# Altium PCB Control_Board.PcbDoc
Units mm, origin at the board's own origin, x right, y up, seen from the top; angles counter-clockwise.
Board outline 74 x 60 mm, 4 copper layers (Top Layer, Int1 (GND), Int2 (GND), Bottom Layer), stack 1.591 mm thick; 66 components, 56 nets, 227 pads, 83 vias.
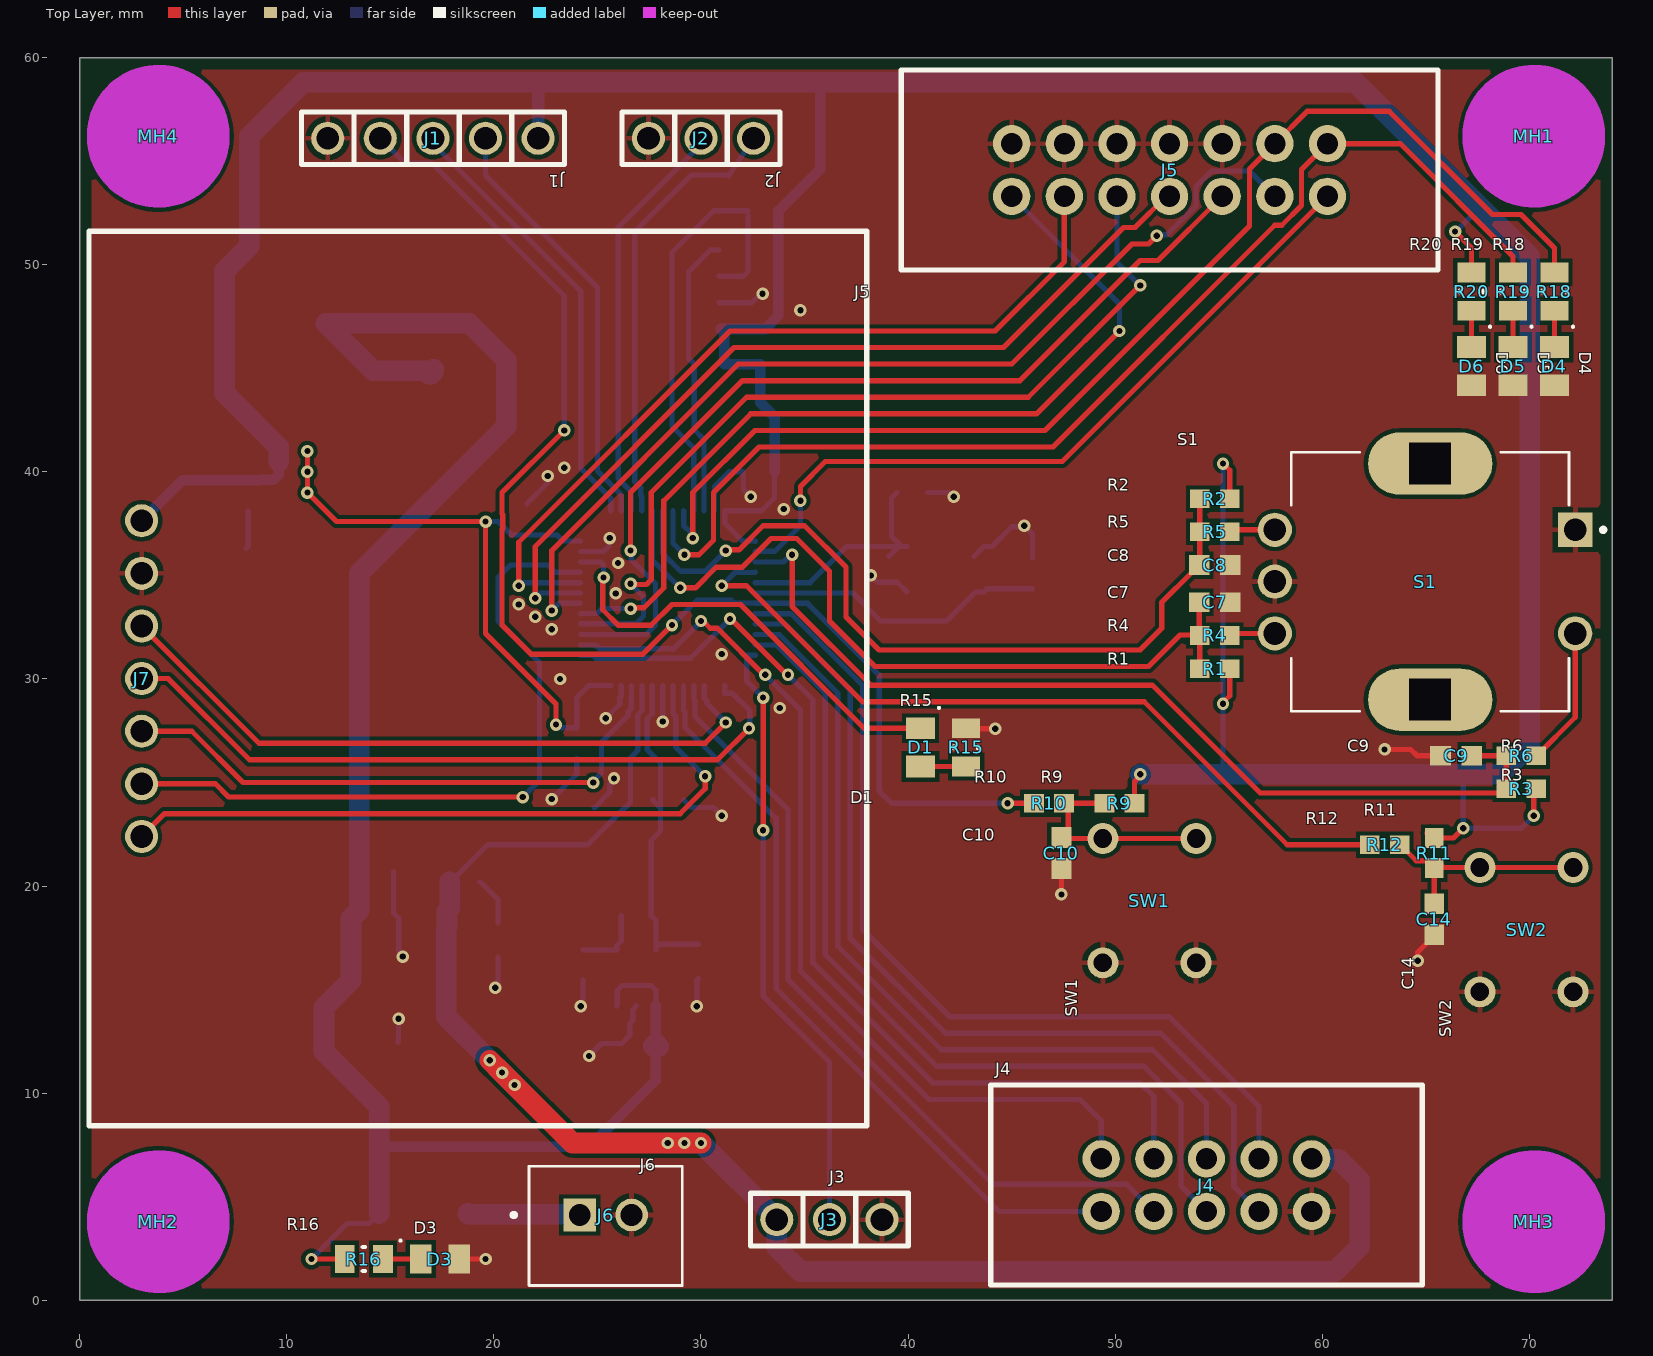
[diagram p0: Top Layer view]
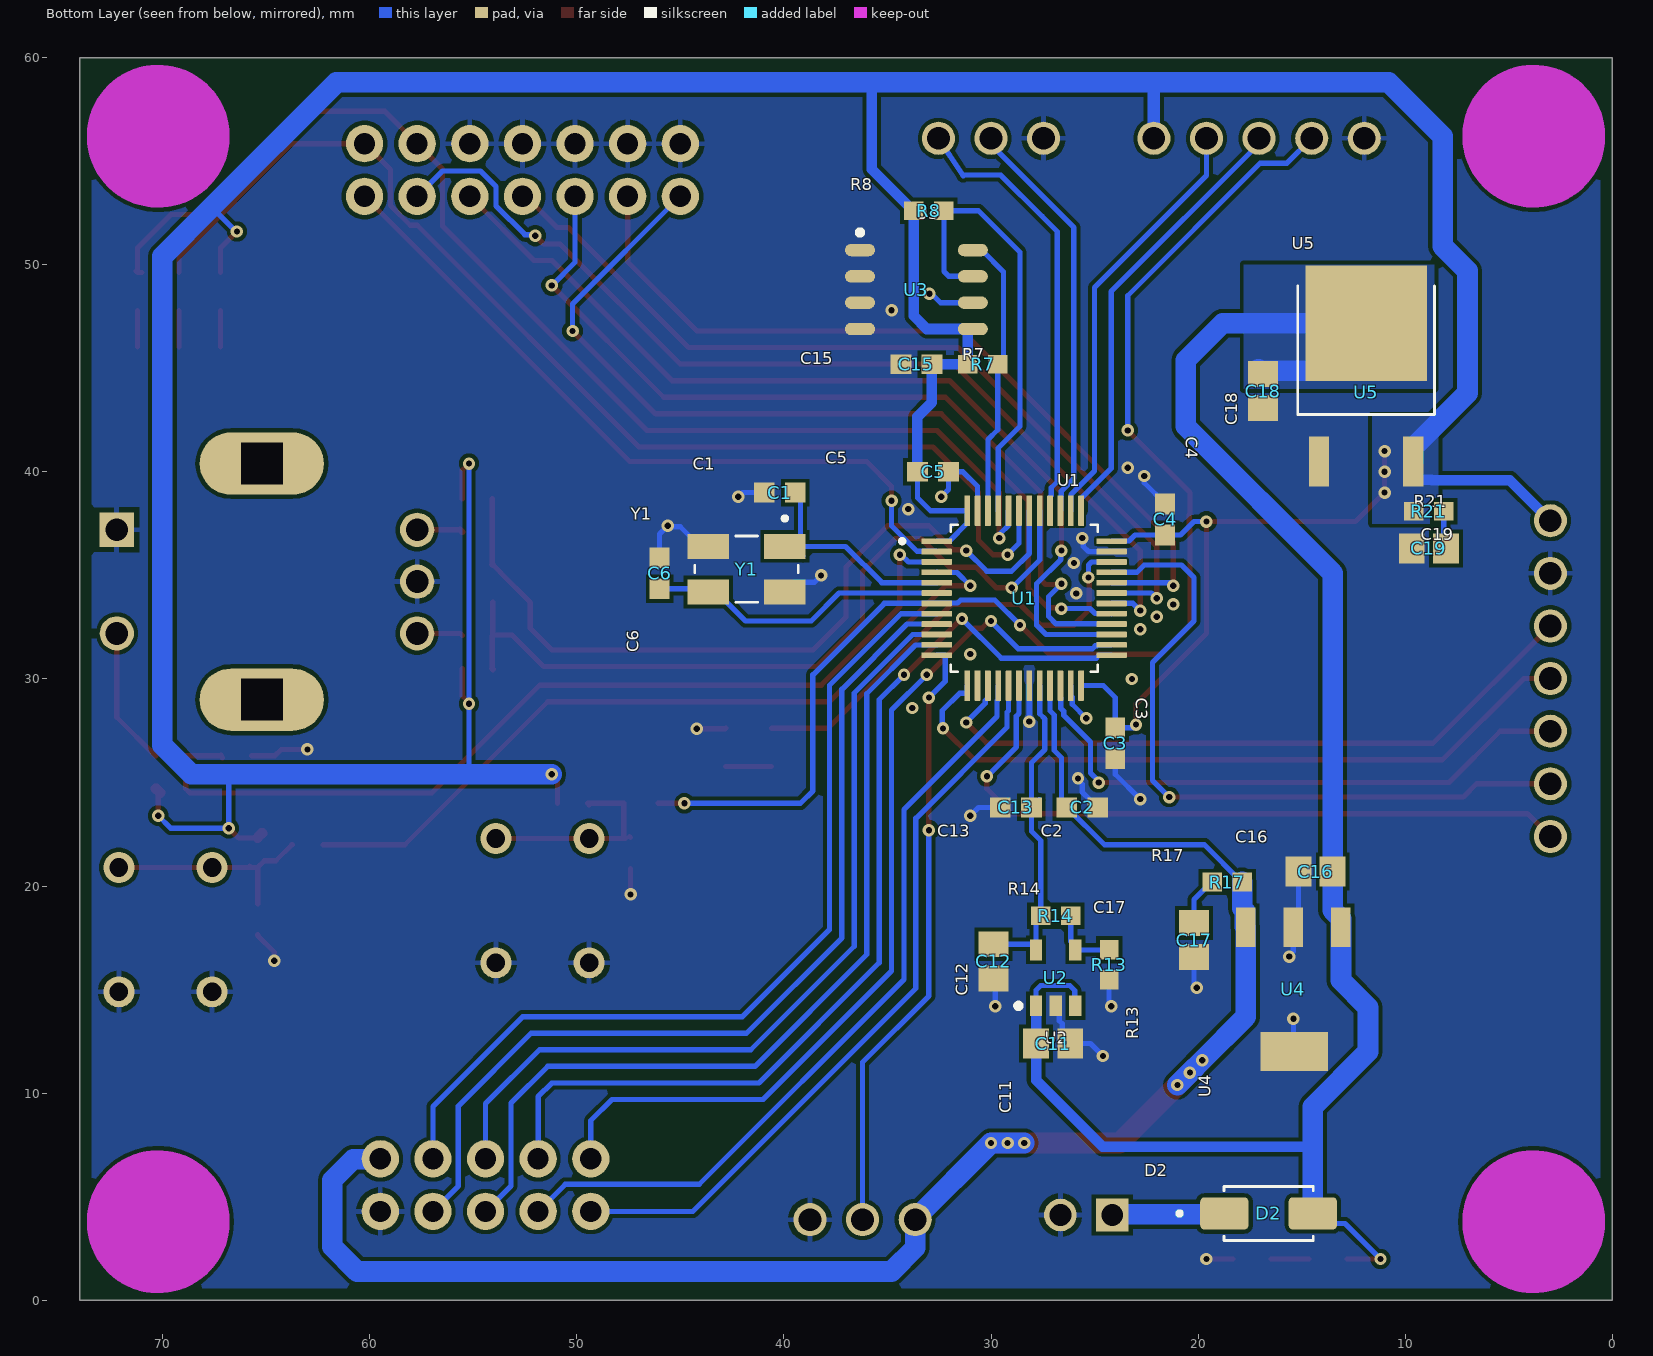
[diagram p1: Bottom Layer view, seen from below]
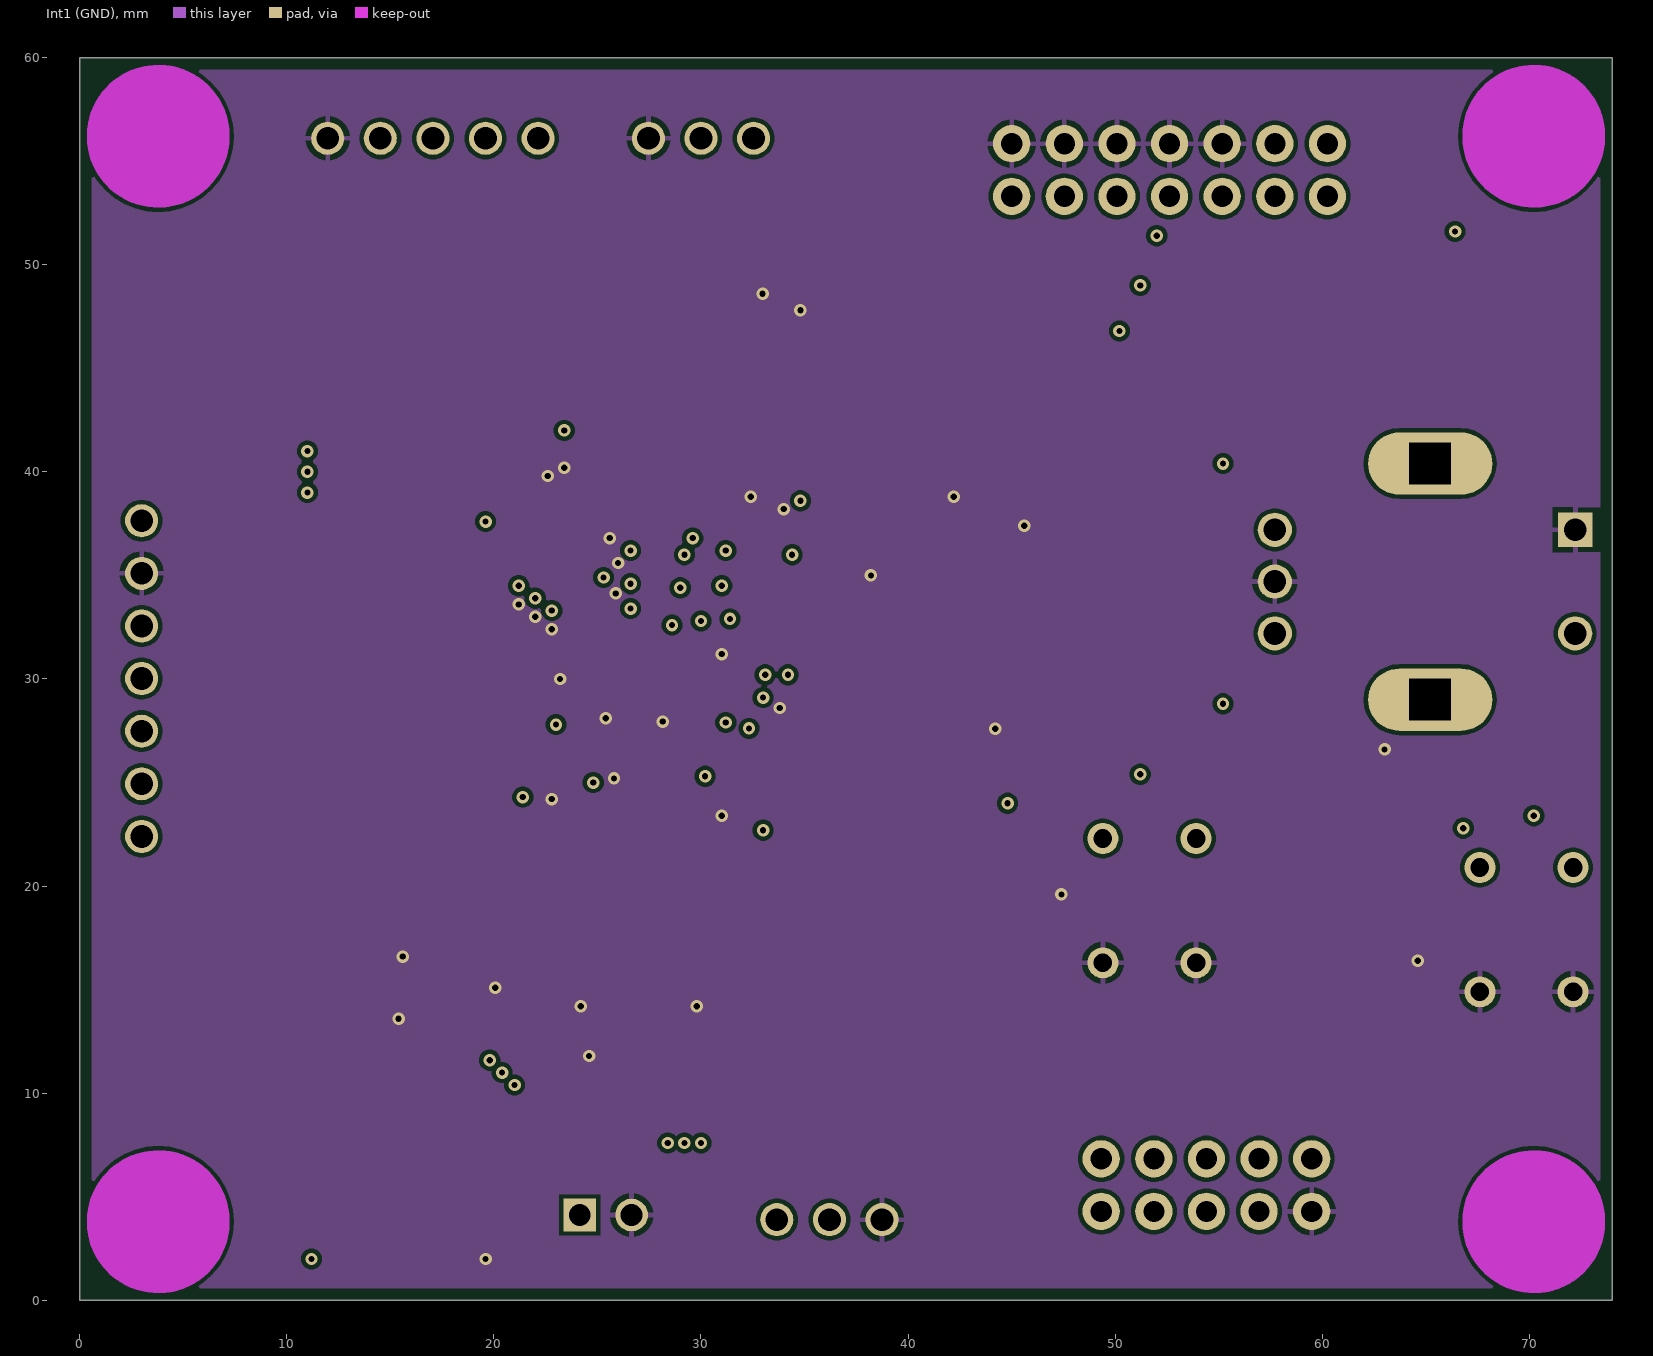
[diagram p2: Int1 (GND)]
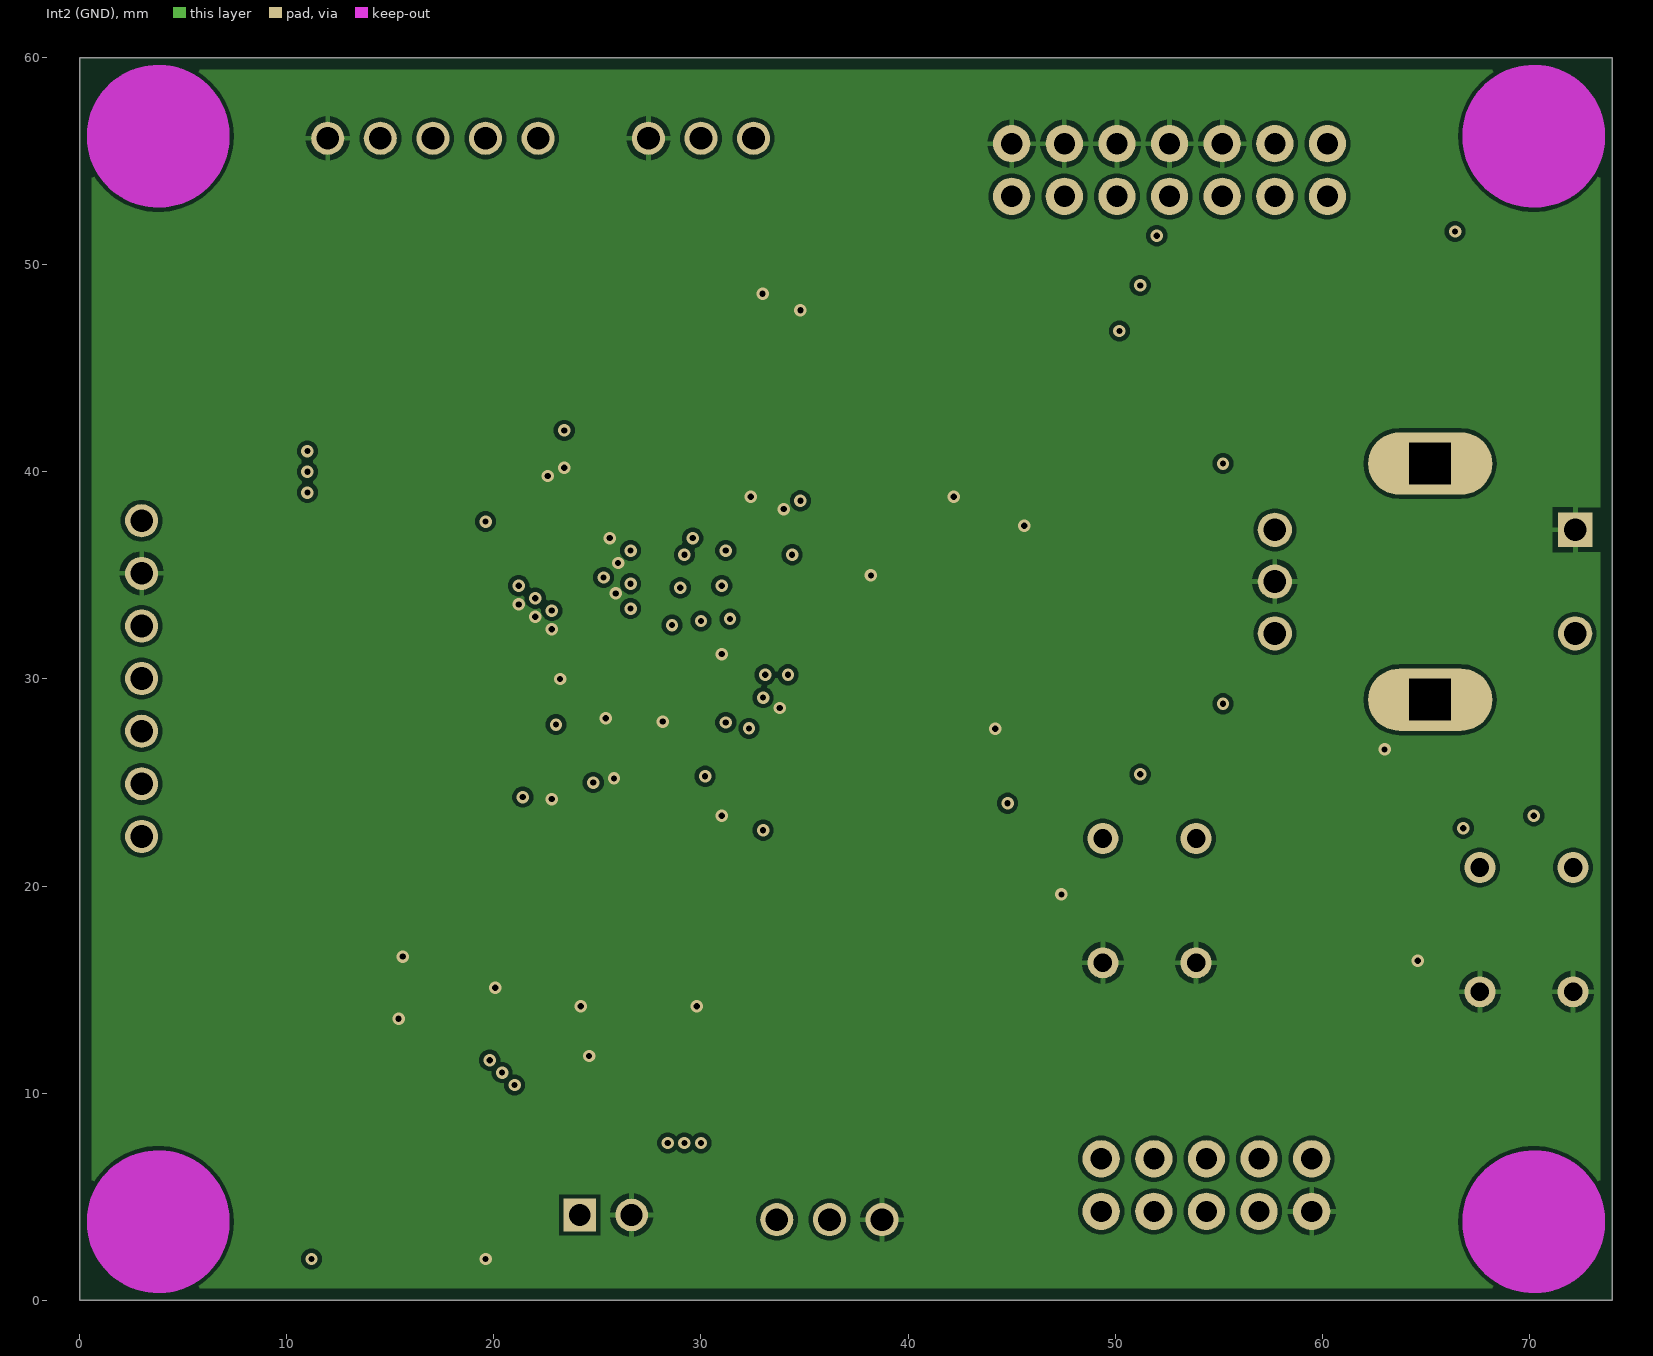
[diagram p3: Int2 (GND)]
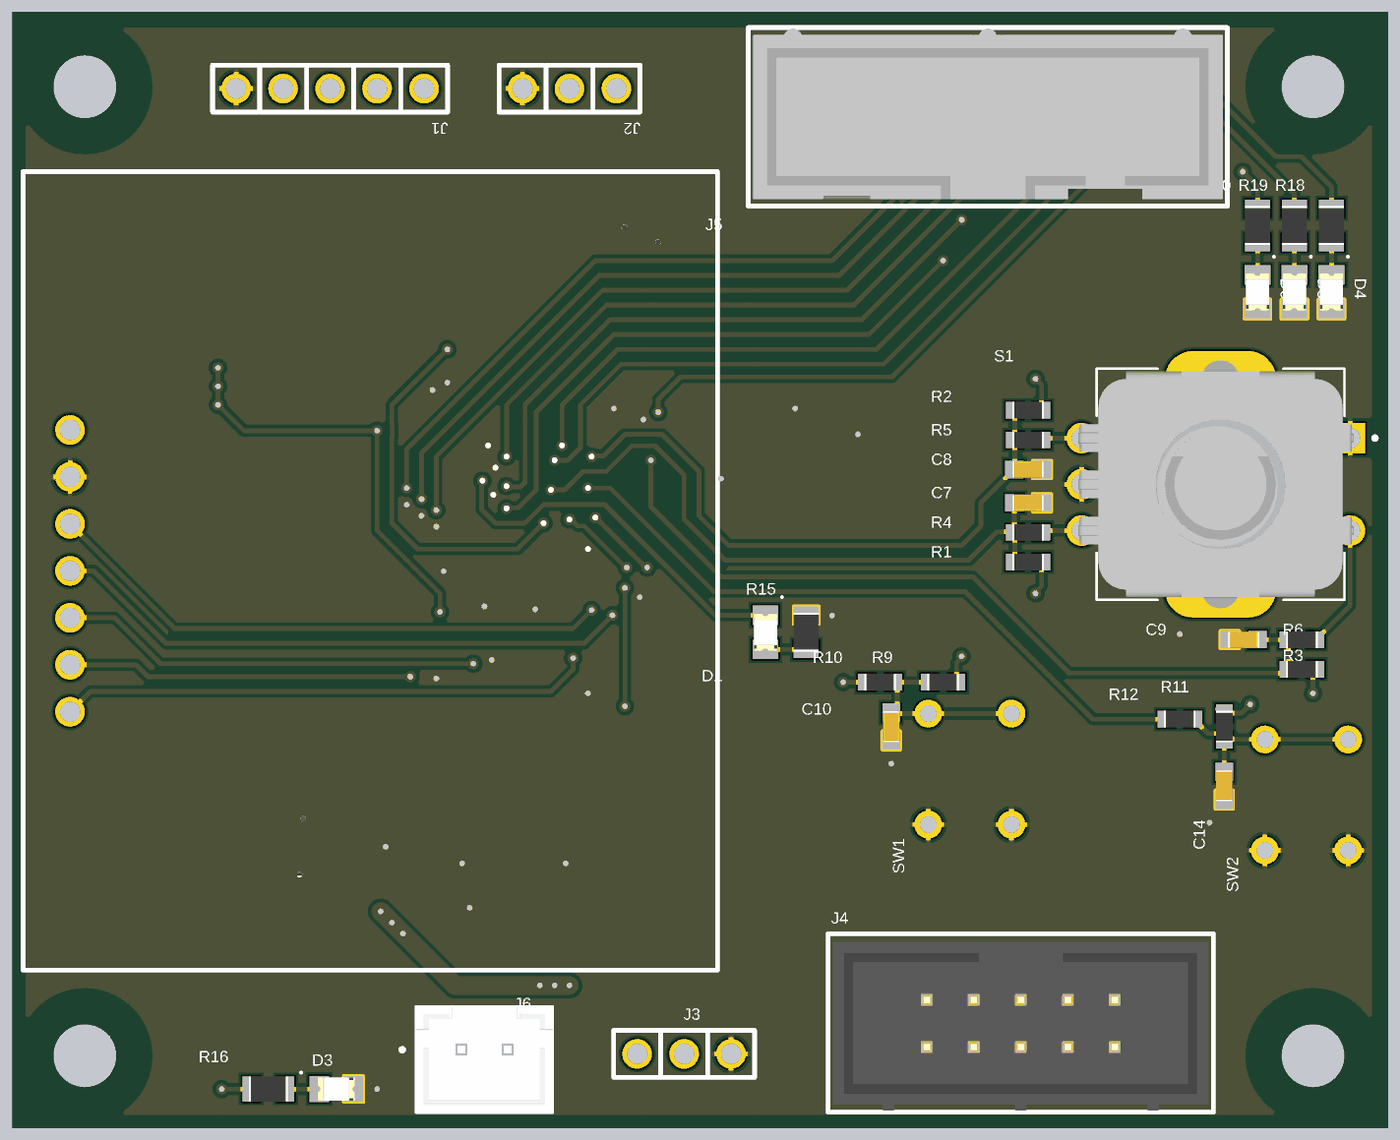
[diagram p4: 3D render of the assembled board from above, using the file's embedded part models]
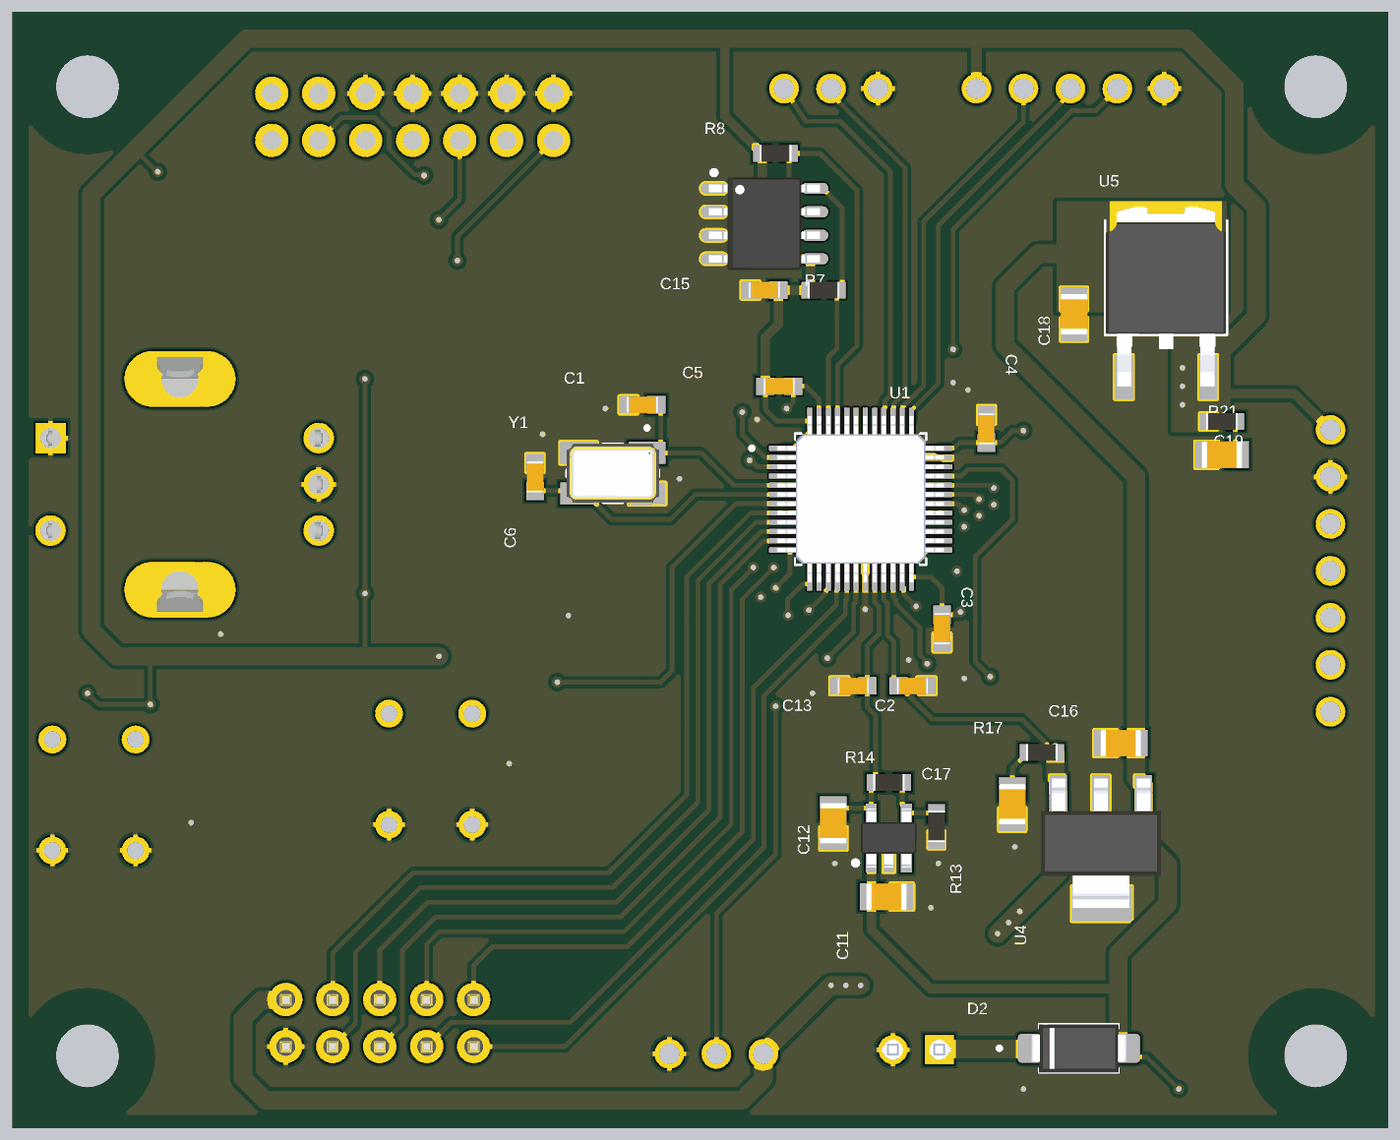
[diagram p5: 3D render of the assembled board from below, using the file's embedded part models]

## Layer stack, top to bottom
Top Solder: solder mask 0.0254, SM-001, Dk 4
Top Layer: signal copper 0.035
Dielectric 1: prepreg 0.2104, PP-017, Dk 4.3
Int1 (GND): signal copper 0.0175
Dielectric 3: core 1.065, Core-039, Dk 4.8
Int2 (GND): signal copper 0.0175
Dielectric 5: prepreg 0.2104, PP-017, Dk 4.3
Bottom Layer: signal copper 0.035
Bottom Solder: solder mask 0.0254, SM-001, Dk 4

## Board outline
0,0 0,60 74,60 74,0

## Design rules (kind name [scope] priority, off if disabled: settings)
Clearance stm32_pad [IsPad AND InComponent('U1')] p1: gap=0.1 ignorepadtopadclearanceinfootprint=FALSE
Clearance Clearance_1 [All] p2: gap=0.2 ignorepadtopadclearanceinfootprint=TRUE
ComponentClearance ComponentClearance_1 [InComponent('J7')] p1: gap=-1 collisioncheckmode=3 verticalgap=0 showdistances=FALSE
ComponentClearance [All] p2: gap=0.254 collisioncheckmode=3 verticalgap=0.254 showdistances=FALSE
Height [All] p1: minheight=0 maxheight=250 prefheight=12.7
HoleSize [All] p1: absolutevalues=TRUE maxlimit=4 minlimit=0.025 maxpercent=80.000 minpercent=20.000
MinimumSolderMaskSliver [All] p1: minsoldermaskwidth=0.1
PlaneClearance [All] p1: clearance=0.254
PlaneConnect vias [IsVia AND InNet('GND')] p1: planeconnectstyle=Direct reliefexpansion=0.508 reliefentries=4 reliefconductorwidth=0.254 reliefairgap=0.254
PlaneConnect [All] p2: planeconnectstyle=Relief reliefexpansion=0.254 reliefentries=4 reliefconductorwidth=0.254 reliefairgap=0.254
PolygonConnect THT_pads [IsThruPin] p1: connectstyle=Relief reliefconductorwidth=0.254 reliefentries=4 polygonreliefangle="90 Angle" airgapwidth=0.254
PolygonConnect PolygonConnect_1 [All] p2: connectstyle=Direct reliefconductorwidth=0.254 reliefentries=4 polygonreliefangle="90 Angle" airgapwidth=0.254
RoutingVias [All] p1: holewidth=0.254 width=0.508 viastyle="Through Hole" minholewidth=0.254 minwidth=0.508 maxholewidth=0.508 maxwidth=1.12
SolderMaskExpansion STM32_Mask [IsPad AND InComponent('U1')] p1: expansion=0 istentingtop=FALSE
SolderMaskExpansion Via_tenting [isvia] p2: expansion=0.102 istentingtop=TRUE
SolderMaskExpansion [All] p3: expansion=0.102 istentingtop=FALSE
Width [All] p1: maxlimit=1 minlimit=0.254 preferedwidth=0.3
24 further rules are at their usual default settings.

## Classes and differential pairs
component class U_STM32G4_mcu: C1 C2 C3 C4 C5 C6 C7 C8 C9 C10 C11 C12 C13 C14 D1 J1 R1 R2 R3 R4 R5 R6 R7 R8 R9 R10 R11 R12 R13 R14 R15 S1 SW1 SW2 U1 U2 Y1
component class Control_Board: C15 C16 C17 C18 C19 D2 D3 D4 D5 D6 J2 J3 J4 J5 J6 J7 MH1 MH2 MH3 MH4 R16 R17 R18 R19 R20 R21 U3 U4 U5

## Components (designator, comment, footprint, x,y, rotation, side; value= is the part's Value field where it differs from the comment)
C1 "15p" CAPACITOR_0603 40.2,39 r180 bottom
C2 "100n" CAPACITOR_0603 25.6,23.8 r0 bottom
C3 "100n" CAPACITOR_0603 24,26.9 r90 bottom
C4 "100n" CAPACITOR_0603 21.6,37.7 r270 bottom
C5 "100n" CAPACITOR_0603 32.8,40 r0 bottom
C6 "15p" CAPACITOR_0603 46,35.1 r90 bottom
C7 "10n" CAPACITOR_0603 54.8,33.7 r180 top
C8 "10n" CAPACITOR_0603 54.8,35.5 r180 top
C9 "100n" CAPACITOR_0603 66.45,26.3 r0 top
C10 "100n" CAPACITOR_0603 47.4,21.6 r90 top
C11 "1u" Capacitor_0805 27,12.4 r0 bottom
C12 "1u" Capacitor_0805 29.873,16.372 r90 bottom
C13 "100n" CAPACITOR_0603 28.8,23.8 r180 bottom
C14 "100n" CAPACITOR_0603 65.4,18.4 r90 top
C15 "100n" CAPACITOR_0603 33.6,45.2 r180 bottom
C16 "1u" Capacitor_0805 14.335,20.7 r180 bottom
C17 "1u" Capacitor_0805 20.2,17.4 r270 bottom
C18 "1u" Capacitor_0805 16.865,43.9 r90 bottom
C19 "10u" Capacitor_0805 8.865,36.3 r0 bottom
D1 "LTST-C171KSKT" LTST-C171K 40.6,26.7 r270 top
D2 "SS14" DIOM5226X230N 16.6,4.2 r180 bottom
D3 "LTST-C171KRKT" LTST-C171K 17.4,2 r0 top
D4 "LTST-C171KRKT" LTST-C171K 71.2,45.1 r270 top
D5 "LTST-C171KRKT" LTST-C171K 69.2,45.1 r270 top
D6 "LTST-C171KRKT" LTST-C171K 67.2,45.1 r270 top
J1 "Goldpin_5pin" Goldpin_5pin 22.14,56.1 r180 top
J2 "Goldpin_3pin" Goldpin_3pin 32.54,56.1 r180 top
J3 "Goldpin_3pin" Goldpin_3pin 33.66,3.9 r0 top
J4 "DS1013-10SSIB1-B-0" DS1013-10SSIB1-B-0 49.32,6.84 r0 top
J5 "DS1013-14SSIBG" DS1013-14SSIBG 45,55.84 r0 top
J6 "JST_B2B-XH-A_(LF)(SN)" JST_B2B-XH-A_(LF)(SN) 25.4,3.6 r180 top
J7 "Display Placeholder" WAVESHARE_25512 3,22.4 r90 top
MH1 "Mounting Hole" "M3 MOUNTING HOLE" 70.2,56.2 r0 top
MH2 "Mounting Hole" "M3 MOUNTING HOLE" 3.8,3.8 r0 top
MH3 "Mounting Hole" "M3 MOUNTING HOLE" 70.2,3.8 r0 top
MH4 "Mounting Hole" "M3 MOUNTING HOLE" 3.8,56.2 r0 top
R1 "10k" RESISTOR_0603 54.8,30.5 r0 top
R2 "10k" RESISTOR_0603 54.8,38.7 r0 top
R3 "47k" RESISTOR_0603 69.6,24.7 r0 top
R4 "10k" RESISTOR_0603 54.8,32.1 r0 top
R5 "10k" RESISTOR_0603 54.8,37.1 r180 top
R6 "47k" RESISTOR_0603 69.6,26.3 r180 top
R7 "4k7" RESISTOR_0603 30.4,45.2 r0 bottom
R8 "4k7" RESISTOR_0603 33,52.6 r0 bottom
R9 "47k" RESISTOR_0603 50.2,24 r0 top
R10 "47k" RESISTOR_0603 46.8,24 r0 top
R11 "47k" RESISTOR_0603 65.4,21.6 r90 top
R12 "47k" RESISTOR_0603 63,22 r0 top
R13 "10k" RESISTOR_0603 24.3,16.2 r90 bottom
R14 "12k1" RESISTOR_0603 26.873,18.572 r0 bottom
R15 "680R" RESISTOR_0805 42.8,26.7 r270 top
R16 "680R" RESISTOR_0805 13.725,2 r180 top
R17 "1R" RESISTOR_0603 18.6,20.2 r180 bottom
R18 "680R" RESISTOR_0805 71.2,48.7 r270 top
R19 "680R" RESISTOR_0805 69.2,48.7 r270 top
R20 "680R" RESISTOR_0805 67.2,48.7 r270 top
R21 "1R" RESISTOR_0603 8.865,38.1 r0 bottom
S1 "PEC11R-4220F-S0024" XDCR_PEC11R-4220F-S0024 65.2,34.7 r270 top
SW1 "TACT-67N-F" TACT-67N-F 53.9,16.3 r180 top
SW2 "TACT-67N-F" TACT-67N-F 72.1,14.9 r180 top
U1 "STM32G491CET6" QFP50P900X900X160-48N 28.4,33.9 r180 bottom
U2 "LDK320AM-R" LDK320AM- 26.878,15.572 r90 bottom
U3 "FM24CL64B-G" FM24CL64B-G 33.6,48.8 r180 bottom
U4 "TC1262-3.3VDB" TC1262-3.3VDB 12.61,18.966 r0 bottom
U5 "LD1117ADT33TR" LD1117ADT33TR 11.891,44.7 r180 bottom
Y1 "QT532S-8.000MEEQ-T" XTAL_QT532S-8.000MEEQ-T 41.8,35.3 r270 bottom

## Footprints (in the part's own frame and the unit in brackets; to place one, negate y for a bottom-side part, rotate by r counter-clockwise, add the part's x,y. Pads: shape width x height; smd on the part's side, far side on the other; paste and mask are expansions set on the pad)
CAPACITOR_0603 [mm] "MLCC capacitor in 0603 package"
  rect 1x0.95 smd: 1(-0.75,0) 2(0.75,0)
  body extent -0.85,-0.45 0.85,0.45, height 0.9
Capacitor_0805 [mm] "MLCC capacitor in 0805 package"
  rect 1.25x1.45 smd: 1(-0.825,0) 2(0.825,0)
  body extent -1.1,-0.72 1.1,0.72, height 1.35
DIOM5226X230N [mm]
  rrect25% 2.33x1.55 smd: 1(-2.135,0) 2(2.135,0)
  silkscreen extent -4.4,-1.3 2.15,1.3, body extent -2.6,-1.3 2.6,1.3, height 2.4
DS1013-10SSIB1-B-0 [mm] "Connector: IDC; socket; male; PIN: 10; straight; THT; 2.54mm; 2x5"
  round 1.8 hole 1.02: 1(0,0) 2(0,-2.54) 3(2.54,0) 4(2.54,-2.54) 5(5.08,0) 6(5.08,-2.54) 7(7.62,0) 8(7.62,-2.54) 9(10.16,0) 10(10.16,-2.54)
  silkscreen extent -5.33,-6.1 15.49,3.56, body extent -5.07,-5.99 15.23,3.11, height 9.1
DS1013-14SSIBG [mm] "Connector: IDC; socket; male; data; PIN: 14; straight; THT; 2.54mm"
  round 1.8 hole 1.02: 1(0,0) 2(0,-2.54) 3(2.54,0) 4(2.54,-2.54) 5(5.08,0) 6(5.08,-2.54) 7(7.62,0) 8(7.62,-2.54) 9(10.16,0) 10(10.16,-2.54) 11(12.7,0) 12(12.7,-2.54) 13(15.24,0) 14(15.24,-2.54)
  silkscreen extent -5.33,-6.1 20.57,3.56, body extent -5.08,-5.72 20.32,3.51, height 9.2
FM24CL64B-G [mm] "IC: FRAM memory; 64kbFRAM; I2C; 8kx8bit; 2.7÷3.6VDC; 1MHz; SO8"
  oval 1.45x0.6 smd: 1(-2.725,1.905) 2(-2.725,0.635) 3(-2.725,-0.635) 4(-2.725,-1.905) 5(2.725,-1.905) 6(2.725,-0.635) 7(2.725,0.635) 8(2.725,1.905)
  silkscreen extent -2.85,2.63 -2.6,2.88, body extent -3,-2.5 3,2.5, height 1.75
Goldpin_3pin [mm]
  round 1.6 hole 1.1: 1(0,0) 2(2.54,0) 3(5.08,0)
  silkscreen extent -1.27,-1.27 6.35,1.27
Goldpin_5pin [mm]
  round 1.6 hole 1.1: 1(0,0) 2(2.54,0) 3(5.08,0) 4(7.62,0) 5(10.16,0)
  silkscreen extent -1.27,-1.27 11.43,1.27
JST_B2B-XH-A_(LF)(SN) [mm] "Connector: wire-board; XH; socket; male; data; 3A; 250V; PIN: 2; 2.5mm"
  rect 1.575x1.575 hole 1.05: 1(1.25,-0.525)
  round 1.575 hole 1.05: 2(-1.25,-0.525)
  silkscreen extent -3.7,-2.88 4.54,2.88, body extent -3.7,-2.88 3.7,2.88, height 7
LD1117ADT33TR [mm] "IC: voltage regulator; LDO,linear,fixed; 3.3V; 1A; DPAK; SMD; ±4%"
  rect 0.98x2.4 smd: 1(-2.28,-4.2) 2(2.28,-4.2)
  rect 5.86x5.57 smd paste-4: 3(0,2.47)
  silkscreen extent -3.3,-1.93 3.3,4.27, body extent -3.25,-4.74 3.25,4.98, height 2.17
LDK320AM- [mm] "IC: voltage regulator; LDO,linear,adjustable; 1.2÷12V; 0.2A; SMD"
  rect 1x0.6 smd: 1(-1.35,0.95) 2(-1.35,0) 3(-1.35,-0.95) 4(1.35,-0.95) 5(1.35,0.95)
  silkscreen extent -1.47,1.68 -1.23,1.93, body extent -1.6,-1.5 1.6,1.5, height 1.25
LTST-C171K [mm] "LED ;SMD; 0805 2x1.25x0.8"
  rect 1.05x1.4 smd: 1(-0.925,0) 2(0.925,0)
  silkscreen extent -1.95,0.84 -1.86,0.94, body extent -1,-0.63 1,0.63, height 0.8
"M3 MOUNTING HOLE" [mm]
  round 2.5 hole 3.4 unplated: 2(0,0)
  Keep-Out Layer circle w3.5: c0,0 r1.7
QFP50P900X900X160-48N [mm]
  rrect25% 1.47x0.28 smd: 1(-4.22,2.75) 2(-4.22,2.25) 3(-4.22,1.75) 4(-4.22,1.25) 5(-4.22,0.75) 6(-4.22,0.25) 7(-4.22,-0.25) 8(-4.22,-0.75) 9(-4.22,-1.25) 10(-4.22,-1.75) 11(-4.22,-2.25) 12(-4.22,-2.75) 25(4.22,-2.75) 26(4.22,-2.25) 27(4.22,-1.75) 28(4.22,-1.25) 29(4.22,-0.75) 30(4.22,-0.25) 31(4.22,0.25) 32(4.22,0.75) 33(4.22,1.25) 34(4.22,1.75) 35(4.22,2.25) 36(4.22,2.75)
  rrect25% 0.28x1.47 smd: 13(-2.75,-4.22) 14(-2.25,-4.22) 15(-1.75,-4.22) 16(-1.25,-4.22) 17(-0.75,-4.22) 18(-0.25,-4.22) 19(0.25,-4.22) 20(0.75,-4.22) 21(1.25,-4.22) 22(1.75,-4.22) 23(2.25,-4.22) 24(2.75,-4.22) 37(2.75,4.22) 38(2.25,4.22) 39(1.75,4.22) 40(1.25,4.22) 41(0.75,4.22) 42(0.25,4.22) 43(-0.25,4.22) 44(-0.75,4.22) 45(-1.25,4.22) 46(-1.75,4.22) 47(-2.25,4.22) 48(-2.75,4.22)
  silkscreen extent -5.99,-3.55 3.55,3.55, body extent -4.5,-4.5 4.5,4.5, height 1.54
RESISTOR_0603 [mm] "SMD resistor in 0603 package"
  rect 0.95x0.9 smd: 1(-0.725,0) 2(0.725,0)
  body extent -0.85,-0.45 0.85,0.45, height 0.55
RESISTOR_0805 [mm] "SMD resistor in 0805 package"
  rect 0.95x1.35 smd: 1(-0.925,0) 2(0.925,0)
  silkscreen extent -0.05,-0.58 0.05,0.58, body extent -1.05,-0.67 1.05,0.67, height 0.6
TACT-67N-F [mm] "Microswitch TACT; SPST-NO; Pos: 2; 0.05A/12VDC; THT; none; 1.6N"
  round 1.5 hole 0.9: 1(0,0) 2(4.5,0) 3(0,-6) 4(4.5,-6)
TC1262-3.3VDB [mm]
  rect 0.95x1.9 smd: 1(0.5,0.95) 2(2.8,0.95) 3(5.1,0.95)
  rect 3.25x1.9 smd: 4(2.75,6.95)
  body extent -0.46,0.18 6.04,7.18, height 1.8
WAVESHARE_25512 [mm] "Waveshare 25512 placeholder"
  round 1.6 hole 1.1: 1(0,0) 2(2.54,0) 3(5.08,0) 4(7.62,0) 5(10.16,0) 6(12.7,0) 7(15.24,0)
  silkscreen extent -13.97,-35 29.21,2.54
XDCR_PEC11R-4220F-S0024 [mm]
  rect 1.65x1.65 hole 1.1 mask+0.102: 1(-2.5,7)
  round 1.65 hole 1.1 mask+0.102: 2(2.5,7) A(-2.5,-7.5) B(2.5,-7.5) C(0,-7.5)
  oval 3x6 hole 2 square mask+0.102: SH1(-5.7,0) SH2(5.7,0)
  silkscreen extent -6.25,-6.7 6.25,8.45, body extent -7,-7.7 7,7.2, height 27.1
XTAL_QT532S-8.000MEEQ-T [mm]
  rect 1.2x2 smd: 1(-1.1,1.85) 2(-1.1,-1.85) 3(1.1,-1.85) 4(1.1,1.85)
  silkscreen extent -2.55,-2.5 1.6,2.5, body extent -1.6,-2.5 1.6,2.5, height 1.05

## Part data
C1 C2 C3 C4 C5 C6 C7 C8 C9 C10 C13 C14 C15: library part CAPACITOR_0603, "MLCC capacitor in 0603 package"
C11 C12 C16 C17 C18 C19: library part CAPACITOR_0805, "MLCC capacitor in 0805 package"
D1: "LED; yellow; SMD; 0805; 18÷180mcd; 1.6÷2.4VDC; 2x1.25x0.8mm; 130°"
D2: "1A, 40V, Schottky Rectifier", Package="SMA-2 Taiwan Semiconductor", Check_prices=https://www.snapeda.com/parts/SS14/taiwan/view-part/?ref=eda, MF="Taiwan Semiconductor", MP=SS14, SnapEDA_Link=https://www.snapeda.com/parts/SS14/taiwan/view-part/?ref=snap
D3 D4 D5 D6: "LED; red; SMD; 0805; 18÷54mcd; 2÷2.4VDC; 2x1.25x0.8mm; 130°; 20mA"
J1: "Goldpin 5pin connector"
J2 J3: "goldpin 3 pin connector"
J4: "Connector: IDC; socket; male; PIN: 10; straight; THT; 2.54mm; 2x5"
J5: "Connector: IDC; socket; male; data; PIN: 14; straight; THT; 2.54mm"
J6: "Connector: wire-board; XH; socket; male; data; 3A; 250V; PIN: 2; 2.5mm"
J7: library part Waveshare_25512, "Waveshare 25512 128x64 OLED display placeholder"
MH1 MH2 MH3 MH4: library part M3_mounting_hole
R1 R2 R3 R4 R5 R6 R7 R8 R9 R10 R11 R12 R13 R14 R17 R21: library part RESISTOR_0603, "SMD resistor in 0603 package"
R15 R16 R18 R19 R20: library part RESISTOR_0805, "SMD resistor in 0805 package"
S1: Package=None, Availability=Unavailable, MF="{'manufacturer': u'Bourns Inc.'}", MP=PEC11R-4220F-S0024, Price=None
SW1 SW2: "Microswitch TACT; SPST-NO; Pos: 2; 0.05A/12VDC; THT; none; 1.6N"
U1: "IC: STM32 ARM microcontroller; 170MHz; LQFP48; 1.71÷3.6VDC"
U2: "IC: voltage regulator; LDO,linear,adjustable; 1.2÷12V; 0.2A; SMD"
U3: "IC: FRAM memory; 64kbFRAM; I2C; 8kx8bit; 2.7÷3.6VDC; 1MHz; SO8"
U4: "LDO Voltage Regulators 500mA Fixed Output CMOS"
U5: "IC: voltage regulator; LDO,linear,fixed; 3.3V; 1A; DPAK; SMD; ±4%"
Y1: "8 MHz Â±10ppm Crystal 10pF 80 Ohms 4-SMD, No Lead", Package="NON STANDARD-4 QST PRODUCTS LLC", Check_prices=https://www.snapeda.com/parts/QT532S-8.000MEEQ-T/QST+PRODUCTS+LLC/view-part/?ref=eda, MF="QST PRODUCTS LLC", MP=QT532S-8.000MEEQ-T, SnapEDA_Link=https://www.snapeda.com/parts/QT532S-8.000MEEQ-T/QST+PRODUCTS+LLC/view-part/?ref=snap

## Via types
v1: diameter 0.6, hole 0.3, Top Layer to Bottom Layer, tented both sides, 83 vias

## Nets (pads, with @x,y where several pads share a name; then routed paths per layer and width w, separated by ;. In a path a pad name is that pad's centre, name@x,y a point inside that pad or via, vN(x,y) a via of type N, cw(c..) or ccw(c..) an arc to the next point about the centre after c; other vN are vias at no path point)
3V3: C3.2 C4.2 C5.2 C15.2 J1.1 J7.7 R1.2 R2.2 R3.2 R7.2 R8.2 R9.2 R11.2 R20.1 R21.2 U1.1 U1.24 U1.36 U1.48 U3.5 U5.2 | length 234.1
  Top Layer w0.254: v1(11,41) v1(11,40) v1(11,39) 12.4,37.6 v1(19.6,37.6) 19.6,32.2 23,28.8 v1(23,27.8) ; R9.2 50.925,25.056 51.2,25.331 v1(51.2,25.4) ; v1(55.2,28.8) 55.2,28.869 55.525,29.194 R1.2 ; v1(55.2,40.4) 55.525,40.075 R2.2 ; R11.2 66.325,22.325 v1(66.8,22.8) ; v1(66.4,51.6) 67.2,50.8 R20.1 ; v1(70.2,23.4) R3.2@70.2,24.575
  Top Layer w0.5: R11.2@65.175,22.55 65.2,22.55 65.4,22.35 R11.2 ; R3.2@70.1,24.5 70.3,24.7 R3.2
  Bottom Layer w0.254: v1(19.6,37.6) 20.2,37.6 20.85,36.95 23.051,36.95 23.338,36.663 24.167,36.663 U1.36 ; v1(23,27.8) 23.15,27.65 C3.2 24,29.1 24.58,29.68 U1.24 ; U3.5 30.965,46.895 U3.5@31.125,46.735 ; U1.1 32.613,36.65 32.6,36.663 32.012,36.663 31.15,37.525 U1.48 32.92,38.12 33.55,38.75 C5.2 ; C15.2 C15.2@32.875,45.225 ; v1(55.2,40.4) v1(55.2,28.8) 55.2,25.415 55.215,25.4 ; v1(66.4,51.6) 66.443,51.6 67.622,52.778 ; 66.753,25.4 66.8,25.353 v1(66.8,22.8) 69.6,22.8 v1(70.2,23.4)
  Bottom Layer w0.5: J7.7 4.96,39.6 8.711,39.6 8.736,39.625 9.371,39.625 9.611,39.865 U5.2
  Bottom Layer w0.508: U3.5@30.965,46.895 33.095,46.895 33.725,47.525 R8.2 33.75,52.6 35.75,54.6 35.75,58.754 35.796,58.8 ; U3.5@31.125,46.735 R7.2 C15.2 32.85,43.35 33.55,42.65 C5.2
  Bottom Layer w0.608: 22.021,58.8 22.14,58.681 J1.1
  Bottom Layer w1: U5.2 9.611,41.19 7,43.801 7,49.7 8.2,50.9 8.2,56.2 10.8,58.8 22.021,58.8 35.796,58.8 61.6,58.8 67.622,52.778 70,50.4 70,26.8 68.6,25.4 66.753,25.4 55.215,25.4 v1(51.2,25.4) ; J1.1@21.978,56.1 J1.1 J1.1@22.255,56.215
3V3A: C2.2 J3.1 J4.9 R17.2 U1.21 U4.3 | length 82.5
  Top Layer w1: v1(19.8,11.6) v1(20.4,11) v1(21,10.4) 23.8,7.6 v1(28.4,7.6) v1(29.2,7.6) v1(30,7.6)
  Bottom Layer w0.254: R17.2 17.9,20.2 19.7,22 24.525,22 26.325,23.8 C2.2 26.6,24.05 26.6,26.2 26.946,26.546 26.946,28.26 27.15,28.464 U1.21
  Bottom Layer w0.508: J4.9 J4.9@59.507,6.813
  Bottom Layer w1: R17.2 17.875,18.935 17.735,18.794 17.735,18.041 U4.3 17.71,13.69 v1(19.8,11.6) v1(20.4,11) v1(21,10.4) ; v1(28.4,7.6) v1(29.2,7.6) v1(30,7.6) 33.66,3.94 J3.1 33.66,2.54 34.8,1.4 60.6,1.4 61.8,2.6 61.8,5.8 60.787,6.813 J4.9@59.507,6.813
5V: C11.2 C16.2 C18.2 D2.2 R16.2 U2.1 U2.3 U4.1 U5.3 | length 90.3
  Top Layer w0.254: v1(11.2,2) R16.2
  Bottom Layer w0.254: v1(11.2,2) 12.919,3.719 13.984,3.719 D2.2 ; C16.2@13.11,20.3 C16.2 ; U2.3 25.955,14.25 25.955,14.955 26.2,15.2 27.6,15.2 27.826,14.974 U2.1@27.826,14.221 ; C11.2@27.825,12.377 27.826,12.378 C11.2@27.828,12.379
  Bottom Layer w0.508: 14.465,7.411 24.611,7.411 27.825,10.625 27.825,12.377 C11.2 ; C11.2@27.826,12.378 27.826,14.221 U2.1
  Bottom Layer w1: D2.2 14.465,7.411 14.465,9.346 11.8,12.011 11.8,14.146 13.11,15.456 U4.1 13.11,18.441 13.51,18.841 C16.2 13.51,35.11 20.6,42.2 20.6,45.385 18.815,47.17 U5.3 14.176,44.885 C18.2@16.865,44.885 ; C18.2 16.965,44.725 17.09,44.85 C18.2@17.09,44.95 ; C11.2@27.7,12.275 C11.2 ; C11.2@27.825,12.377 C11.2@27.95,12.252
ACN_IN+: J4.5 U1.10 | length 41
  Bottom Layer w0.254: U1.10 33.779,32.15 36.6,29.329 36.6,17.1 41.6,12.1 51.8,12.1 54.4,9.5 J4.5
ACN_IN-: J4.6 U1.11 | length 42.8
  Bottom Layer w0.254: U1.11 32.633,31.637 33.65,31.637 36,29.287 36,16.7 41.4,11.3 51.4,11.3 53.173,9.527 53.173,5.527 J4.6
AUX_IN+: J4.3 U1.25 | length 48.5
  Top Layer w0.254: v1(31.4,32.9) 31.45,32.9 34.15,30.2 v1(34.2,30.2)
  Bottom Layer w0.254: U1.25 24.775,31.15 24.925,31 29.5,31 v1(31.4,32.9) ; v1(34.2,30.2) 35.4,29 35.4,16.3 41.2,10.5 51.2,10.5 51.86,9.84 J4.3
AUX_IN-: J4.4 U1.16 | length 38.4
  Bottom Layer w0.254: U1.16 29.663,29.667 29.663,28.992 29.709,28.946 29.709,28.191 34.2,23.7 34.2,15.5 44.087,5.613 50.547,5.613 J4.4
AUX_OUT: J5.8 U1.31 | length 42.4
  Top Layer w0.254: v1(22,33.9) 22,36.4 31.6,46 44.6,46 50.4,51.8 50.958,51.8 52.458,53.3 J5.8
  Bottom Layer w0.254: v1(22,33.9) 22.25,34.15 U1.31
BRAKE: J5.11 R18.1 U1.44 | length 58.7
  Top Layer w0.254: v1(29.6,36.8) 29.6,39 32.6,42 46.6,42 56.473,51.873 56.473,54.613 J5.11 59.26,57.4 63.225,57.4 68.202,52.423 69.577,52.423 71.2,50.8 R18.1 ; R18.1@71,49.625 R18.1 ; R18.1@71.275,49.7 R18.1
  Bottom Layer w0.254: U1.44 29.163,38.107 29.163,37.406 29.551,37.017 29.551,36.849 v1(29.6,36.8)
DRV_DIS: J5.14 U1.2 | length 35.8
  Top Layer w0.254: v1(34.8,38.6) 34.8,39.3 36,40.5 47.44,40.5 J5.14
  Bottom Layer w0.254: U1.2 32.633,36.163 33.563,36.163 34.8,37.4 v1(34.8,38.6)
ENC_A: C8.2 R2.1 R5.2 U1.42 | length 38.8
  Top Layer w0.254: v1(31.2,36.2) 31.235,36.235 31.835,36.235 33,37.4 35,37.4 37,35.4 37,33 38.6,31.4 51.2,31.4 52.238,32.438 52.238,33.688 53.677,35.127 53.677,35.152 54.025,35.5 C8.2 ; C8.2@54.075,35.525 R5.2 R2.1
  Top Layer w0.3: C8.2 C8.2@54.075,35.525
  Bottom Layer w0.254: U1.42 28.15,36.064 29.014,35.2 30.2,35.2 v1(31.2,36.2)
ENC_B: C7.2 R1.1 R4.1 U1.41 | length 38.2
  Top Layer w0.254: v1(29,34.4) 29.734,34.4 30.734,35.4 32,35.4 33.38,36.78 34.62,36.78 36.2,35.2 36.2,32.8 38.4,30.6 51.6,30.6 53.125,32.125 R4.1@54.05,32.125 ; C7.2 R4.1@54.05,32.125 ; R1.1 R4.1 R4.1@54.05,32.125
  Top Layer w0.3: R1.1@54.05,30.475 R1.1
  Bottom Layer w0.254: U1.41 27.65,35.75 v1(29,34.4)
ENC_BTN: C9.2 R3.1 R6.2 U1.3 | length 46.2
  Top Layer w0.254: v1(34.4,36) 34.4,33.5 38.2,29.7 51.8,29.7 57,24.5 68.675,24.5 R3.1 R6.2 C9.2 C9.2@67.093,26.193
  Top Layer w0.3: C9.2@67.175,26.3 C9.2
  Bottom Layer w0.254: U1.3 33.981,35.65 34.331,36 v1(34.4,36)
GND: C1.1 C2.1 C3.1 C4.1 C5.1 C6.2 C7.1 C8.1 C9.1 C10.1 C11.1 C12.1 C13.1 C14.1 C15.1 C16.1 C17.2 C18.1 C19.2 D3.2 D4.2 D5.2 D6.2 J1.5 J2.3 J3.3 J4.10 J5.1 J5.3 J5.5 J5.7 J5.9 J6.2 J7.6 R13.1 R15.1 S1.1 S1.C SW1.1 SW1.2 SW2.1 SW2.2 U1.19 U1.23 U1.35 U1.47 U2.2 U3.1 U3.2 U3.3 U3.4 U3.6 U4.2 U4.4 U5.1 Y1.2 Y1.4 | length 50.7
  Top Layer w0.254: D3.2 v1(19.6,2) ; R15.1 42.825,27.6 v1(44.2,27.6) ; v1(47.4,19.6) C10.1 ; J5.9@54.864,55.544 J5.9 ; v1(63,26.6) 64.262,26.6 64.562,26.3 C9.1 ; v1(64.6,16.4) 64.6,16.825 65.4,17.625 C14.1
  Bottom Layer w0.254: C16.1 15.16,18.702 15.41,18.452 15.41,16.859 15.6,16.669 v1(15.6,16.6) ; U4.4@15.36,12.452 15.4,12.492 v1(15.4,13.6) ; v1(20.065,15.1) 20.065,15.169 20.2,15.303 C17.2 ; C4.1 21.6,38.475 22.6,39.475 v1(22.6,39.8) ; v1(22.8,24.2) 24,25.4 C3.1 ; U1.35 25.296,36.15 25.551,36.405 25.551,36.751 v1(25.6,36.8) ; v1(24.2,14.2) 24.3,14.3 R13.1 ; v1(24.6,11.8) 25.2,12.4 C11.1 26.557,12.782 26.557,13.357 26.705,13.505 26.705,14.049 U2.2 ; C2.1 24.875,23.8 25.223,24.148 25.223,24.173 25.6,24.55 25.6,24.931 25.8,25.131 v1(25.8,25.2) ; v1(25.4,28.1) 26.08,28.78 26.08,29.117 26.15,29.187 U1.23 ; v1(28.15,27.943) U1.19 ; C13.1@29.177,24.148 29.525,23.8 C13.1 30.6,23.8 v1(31,23.4) ; v1(29.8,14.2) 29.8,15.475 C12.1 ; U1.47 30.65,39.301 31.349,40 C5.1 32.05,39.15 v1(32.4,38.8) ; U3.6 32.443,48.165 32.877,48.599 v1(32.971,48.599) ; v1(38.2,35) 38.527,34.673 39.477,34.673 Y1.4 ; C1.1 42,39 v1(42.2,38.8) ; Y1.2@43.177,35.927 Y1.2 44.05,36.4 45.001,37.351 45.551,37.351 v1(45.6,37.4) 46,37 C6.2
  other v1: 33.8,28.6 23.2,30 31,31.2 22.8,32.4 22,33 21.2,33.6 25.885,34.133 26,35.6 34,38.2 23.4,40.2 34.8,47.8
I2C1_SCL: R8.1 U1.45 U3.7 | length 21.6
  Bottom Layer w0.254: U1.45 29.65,41.15 28.6,42.2 28.6,50.6 30.6,52.6 R8.1 ; U3.7 32.035,49.435 32.275,49.675 R8.1@32.275,52.4
I2C1_SDA: R7.1 U1.46 U3.8 | length 13.8
  Bottom Layer w0.254: U1.46 30.15,41.558 29.675,42.033 R7.1 29.4,45.475 29.4,49.655 30.45,50.705 U3.8
LED_PWM: D1.1 U1.34 | length 21.9
  Top Layer w0.254: v1(25.299,34.899) 25.256,34.856 25.256,33.344 26,32.6 27.6,32.6 28.6,33.6 31.9,33.6 37.875,27.625 D1.1
  Bottom Layer w0.254: U1.34 25.15,35.65 25.299,35.501 v1(25.299,34.899)
MAIN_IN+: J4.1 U1.26 | length 45
  Top Layer w0.254: v1(30,32.8) 30.094,32.8 30.447,32.447 30.79,32.447 33.037,30.2 v1(33.1,30.2)
  Bottom Layer w0.254: U1.26 24.193,31.637 24.868,31.637 24.901,31.604 24.963,31.604 25.113,31.454 28.681,31.454 30,32.773 v1(30,32.8) ; v1(33.1,30.2) 34.8,28.5 34.8,15.9 41,9.7 48.3,9.7 49.32,8.68 J4.1
MAIN_IN-: J4.2 U1.17 | length 36.6
  Bottom Layer w0.254: U1.17 29.15,28.472 29.231,28.391 29.231,27.669 33.627,23.273 33.627,15.073 44.4,4.3 J4.2
MAIN_OUT: J5.12 U1.30 | length 48
  Top Layer w0.254: v1(22.8,33.3) 22.8,36.2 31.8,45.2 45,45.2 50.8,51 51.6,51 v1(52,51.4)
  Bottom Layer w0.254: v1(22.8,33.3) 23.15,33.65 U1.30 ; v1(52,51.4) 52.049,51.449 52.504,51.449 53.89,52.835 53.89,53.765 54.652,54.527 56.473,54.527 J5.12
N_OUT: J5.4 U1.32 | length 40.3
  Top Layer w0.254: v1(21.2,34.5) 21.2,36.6 31.4,46.8 44.2,46.8 47.54,50.14 J5.4
  Bottom Layer w0.254: v1(21.2,34.5) 21.35,34.65 U1.32
NetC10_2: C10.2 R9.1 R10.2 SW1.3 SW1.4 | length 9.8
  Top Layer w0.254: C10.2 C10.2@47.45,22.4 ; R10.2@47.725,23.9 47.725,22.375 47.65,22.3 SW1.4 SW1.3 ; R10.2@47.725,24 R9.1 R9.1@49.4,23.925
NetC14_2: C14.2 R11.1 R12.2 SW2.3 SW2.4 | length 10.7
  Top Layer w0.254: R12.2 63.75,22 64.527,21.223 65.077,21.223 65.4,20.9 R11.1 ; C14.2 R11.1 ; R11.1@65.8,20.975 R11.1@65.725,20.9 ; SW2.3 SW2.4 R11.1@65.725,20.9 ; R11.1 65.425,20.9 R11.1@65.725,20.9
NetC17_1: C17.1 R17.1 | length 2.4
  Bottom Layer w0.254: R17.1 19.35,20.2 20.2,19.35 C17.1
NetC19_1: C19.1 R21.1 | length 1.8
  Bottom Layer w0.254: C19.1 8.14,36.4 R21.1
NetD1_2: D1.2 R15.2 | length 2.2
  Top Layer w0.254: D1.2 R15.2
NetD2_1: D2.1 J6.1 | length 5.4
  Bottom Layer w1: D2.1 18.772,4.163 24.112,4.163 J6.1
NetD3_1: D3.1 R16.1 | length 1.8
  Top Layer w0.254: R16.1 D3.1
NetD4_1: D4.1 R18.2 | length 1.8
  Top Layer w0.254: D4.1 R18.2
NetD5_1: D5.1 R19.2 | length 1.8
  Top Layer w0.254: D5.1 R19.2
NetD6_1: D6.1 R20.2 | length 1.8
  Top Layer w0.254: D6.1 R20.2
NetR4_2: R4.2 S1.B | length 2.2
  Top Layer w0.254: R4.2 55.625,32.2 S1.B
NetR5_1: R5.1 S1.A | length 2.2
  Top Layer w0.254: R5.1@55.625,37.2 S1.A
  Top Layer w0.3: R5.1 R5.1@55.625,37.2
NetR6_1: R6.1 S1.2 | length 7.1
  Top Layer w0.254: R6.1@70.6,26.575 R6.1 70.35,26.3 72.2,28.15 S1.2
NetR13_2: R13.2 R14.1 U2.4 | length 3.4
  Bottom Layer w0.254: R13.2 24.303,16.922 U2.4 25.928,17.123 26.148,17.342 R14.1
NRST: J1.4 R10.1 U1.7 | length 63.9
  Top Layer w0.254: v1(23.4,42) 20.4,39 20.4,37.97 20.427,37.943 20.427,37.257 20.4,37.23 20.4,32.6 21.8,31.2 27.2,31.2 v1(28.6,32.6) ; v1(44.8,24) R10.1
  Bottom Layer w0.254: J1.4 15.72,54.9 17,54.9 23.4,48.5 v1(23.4,42) ; v1(28.6,32.6) 29.817,33.817 31.464,33.817 31.618,33.663 32.607,33.663 U1.7 35.15,33.65 38.6,30.2 38.6,24.6 39.2,24 v1(44.8,24)
OLED_CS: J7.3 U1.22 | length 28.3
  Top Layer w0.254: J7.3 5.42,27.48 7.9,25 v1(24.8,25)
  Bottom Layer w0.254: v1(24.8,25) 24.8,25.069 25.2,25.469 25.2,26.961 26.492,28.253 26.492,28.448 26.637,28.593 26.637,29.072 26.65,29.085 U1.22
OLED_DC: J7.2 U1.33 | length 34.8
  Top Layer w0.254: J7.2 6.56,24.94 7.2,24.3 v1(21.4,24.3)
  Bottom Layer w0.254: v1(21.4,24.3) 22.2,25.1 22.2,30.8 20.2,32.8 20.2,34.9 20.8,35.5 22.6,35.5 22.95,35.15 U1.33
OLED_RST: J7.1 U1.18 | length 33.8
  Top Layer w0.254: J7.1 4.1,23.5 29,23.5 30.2,24.7 v1(30.2,25.3)
  Bottom Layer w0.254: U1.18 28.65,28.33 28.777,28.203 28.777,26.723 v1(30.2,25.3)
OSC_IN: C1.2 U1.5 Y1.1 | length 11.9
  Bottom Layer w0.254: U1.5 35.271,34.65 37.021,36.4 Y1.1@39.55,36.4 ; Y1.1@39.077,35.927 Y1.1@39.55,36.4 ; C1.2 39.2,38.75 39.2,36.873 Y1.1@39.673,36.4 ; Y1.1 Y1.1@39.673,36.4 ; Y1.1 Y1.1@39.673,36.4 ; Y1.1@39.55,36.4 Y1.1@39.673,36.4
OSC_OUT: C6.1 U1.6 Y1.3 | length 14.6
  Bottom Layer w0.254: U1.6 37.33,34.15 38.68,32.8 41.85,32.8 43.25,34.2 Y1.3 43.8,34.35 C6.1
PRECHARGE: J5.13 R19.1 U1.43 | length 56.2
  Top Layer w0.254: v1(29.2,36) 29.9,36 30.6,36.7 30.6,39 32.8,41.2 47,41.2 57.7,51.9 58.035,51.9 58.99,52.854 58.99,54.59 J5.13 63.76,55.84 69.2,50.4 R19.1
  Bottom Layer w0.254: U1.43 28.65,36.55 v1(29.2,36)
  Bottom Layer w1: J5.13@60.103,55.977 J5.13
RUN_BTN: R12.1 U1.4 | length 38.3
  Top Layer w0.254: v1(31,34.5) 32.2,34.5 37.8,28.9 51.4,28.9 58.3,22 R12.1@62.25,22
  Bottom Layer w0.254: v1(31,34.5) 31.637,35.137 32.607,35.137 U1.4
SPI1_MOSI: J7.5 U1.15 | length 33.2
  Top Layer w0.254: J7.5 8.66,26.9 30.2,26.9 v1(31.2,27.9)
  Bottom Layer w0.254: U1.15 30.163,29.667 30.163,29.072 30.283,28.952 30.283,28.817 v1(31.2,27.9)
SPI1_SCK: J7.4 U1.13 | length 34.4
  Top Layer w0.254: J7.4 4.28,30.02 8.2,26.1 30.8,26.1 v1(32.316,27.616)
  Bottom Layer w0.254: U1.13 31.15,29.321 31.163,29.308 31.522,29.308 32.351,28.479 32.351,27.651 v1(32.316,27.616)
SWCLK: J1.2 U1.38 | length 20.7
  Bottom Layer w0.254: J1.2 19.6,54.3 25,48.9 25,40.036 26.137,38.899 U1.38@26.137,38.715 ; U1.38 U1.38@26.15,38.715
SWDIO: J1.3 U1.37 | length 21.5
  Bottom Layer w0.254: J1.3 17.06,55.84 24.2,48.7 24.2,40.165 25.65,38.715 U1.37
TEMP_ADC: J3.2 U1.12 | length 29.3
  Top Layer w0.254: v1(33,22.7) v1(33,29.1)
  Bottom Layer w0.254: U1.12 32.226,31.15 32.213,31.137 32.213,29.887 v1(33,29.1) ; v1(33,22.7) 33,14.7 36.2,11.5 J3.2
UART_RX: J2.2 U1.39 | length 19.9
  Bottom Layer w0.254: U1.39 26.637,38.133 26.637,38.808 26.604,38.841 26.604,39.074 26,39.678 26,51.8 30,55.8 J2.2
UART_TX: J2.1 U1.40 | length 21.6
  Bottom Layer w0.254: U1.40 27.137,38.133 27.137,38.808 27.091,38.854 27.091,39.229 26.8,39.52 26.8,51.6 27.488,52.288 ; 27.545,52.345 27.488,52.288 ; 31.338,54.296 ccw(c31.158,54.475) 31.369,54.334 ; J2.1 31.369,54.335 ; 27.488,52.288 29.534,54.334 31.369,54.334
VDC_IN+: J4.7 U1.8 | length 43.6
  Bottom Layer w0.254: U1.8 34.35,33.15 37.8,29.7 37.8,17.9 42,13.7 52.6,13.7 56.94,9.36 J4.7
VDC_IN-: J4.8 U1.9 | length 45.4
  Bottom Layer w0.254: U1.9 34.05,32.65 37.2,29.5 37.2,17.5 41.8,12.9 52.2,12.9 55.713,9.387 55.713,5.527 J4.8
VREF+: C12.2 C13.2 R14.2 U1.20 U2.5 | length 16.1
  Bottom Layer w0.254: U1.20 27.65,28.322 27.4,28.072 27.4,26.604 28.05,25.954 C13.2 ; C13.2@27.677,24.173 27.677,24.148 28.025,23.8 C13.2 ; U2.5 U2.5@27.828,17.024 ; C12.2 28.001,17.197 U2.5@27.828,17.024 ; U2.5@27.828,17.024 27.828,18.342 R14.2 27.598,22.198 28.05,22.65 C13.2
~AUX_OUT: J5.6 U1.28 | length 42.9
  Top Layer w0.254: v1(26.6,34.6) 26.638,34.562 27.362,34.562 27.6,34.8 27.6,39 32.2,43.6 45.8,43.6 v1(51.2,49)
  Bottom Layer w0.254: U1.28 24.193,32.663 26.863,32.663 27.227,33.027 27.227,33.973 v1(26.6,34.6) ; J5.6 50.08,50.12 v1(51.2,49)
~MAIN_OUT: J5.10 U1.27 | length 45.2
  Top Layer w0.254: v1(26.6,36.2) 26.6,39 32,44.4 45.4,44.4 51.2,50.2 52.06,50.2 J5.10
  Bottom Layer w0.254: U1.27 27.35,32.15 27.8,32.6 27.8,34.6 26.628,35.772 26.628,36.172 v1(26.6,36.2)
~N_OUT: J5.2 U1.29 | length 42.8
  Top Layer w0.254: v1(26.6,33.4) 26.635,33.435 27.235,33.435 28.2,34.4 28.2,38.6 32.4,42.8 46.2,42.8 v1(50.2,46.8)
  Bottom Layer w0.254: U1.29 24.193,33.163 24.982,33.163 25.219,33.4 v1(26.6,33.4) ; J5.2 50.2,48.1 v1(50.2,46.8)
pads on no net: MH1.2 MH2.2 MH3.2 MH4.2 S1.SH1 S1.SH2 U1.14

## Polygon pours and split planes (outlines as drawn)
3V3 on Bottom Layer "3V3_L04_P004" (solid, remove dead copper, pour order 4): 8.4,37.5 8.4,42.7 11.6,42.7 11.6,37.5
5V on Bottom Layer "5V_L04_P016" (solid, remove dead copper, pour order 16): 8.6,50 8.6,44 17.8,44 17.8,50
GND on Bottom Layer "GND_L04_P025" (solid, remove dead copper, pour order 25): 73.4,59.4 73.4,0.6 0.6,0.6 0.6,59.4
GND on Top Layer "GND_L01_P024" (solid, remove dead copper, pour order 24): 73.4,59.4 73.4,0.6 0.6,0.6 0.6,59.4
GND on Int1 (GND) "GND_L02_P026" (solid, remove dead copper, pour order 26): 0.6,59.4 0.6,0.6 73.4,0.6 73.4,59.4
GND on Int2 (GND) "GND_L03_P027" (solid, remove dead copper, pour order 27): 0.6,59.4 0.6,0.6 73.4,0.6 73.4,59.4

## Silkscreen, mask and mechanical layers (free items; w line width, h text height)
Board Shape:
  lines w0.254: 0,60 0,0 74,0 ; 0.127,60.127 74.127,60.127 74.127,0.127